# Altium PCB 后改2025底板线路板图.PcbDoc (part 2 of 4)
Units mm, origin at the board's own origin, x right, y up, seen from the top; angles counter-clockwise.
Board outline 200 x 230 mm, 4 copper layers (Top Layer, GND, POWER, Bottom Layer), stack 0.603 mm thick; 355 components, 331 nets, 1313 pads, 565 vias.
Unrouted connection lines stored in the file: 251.
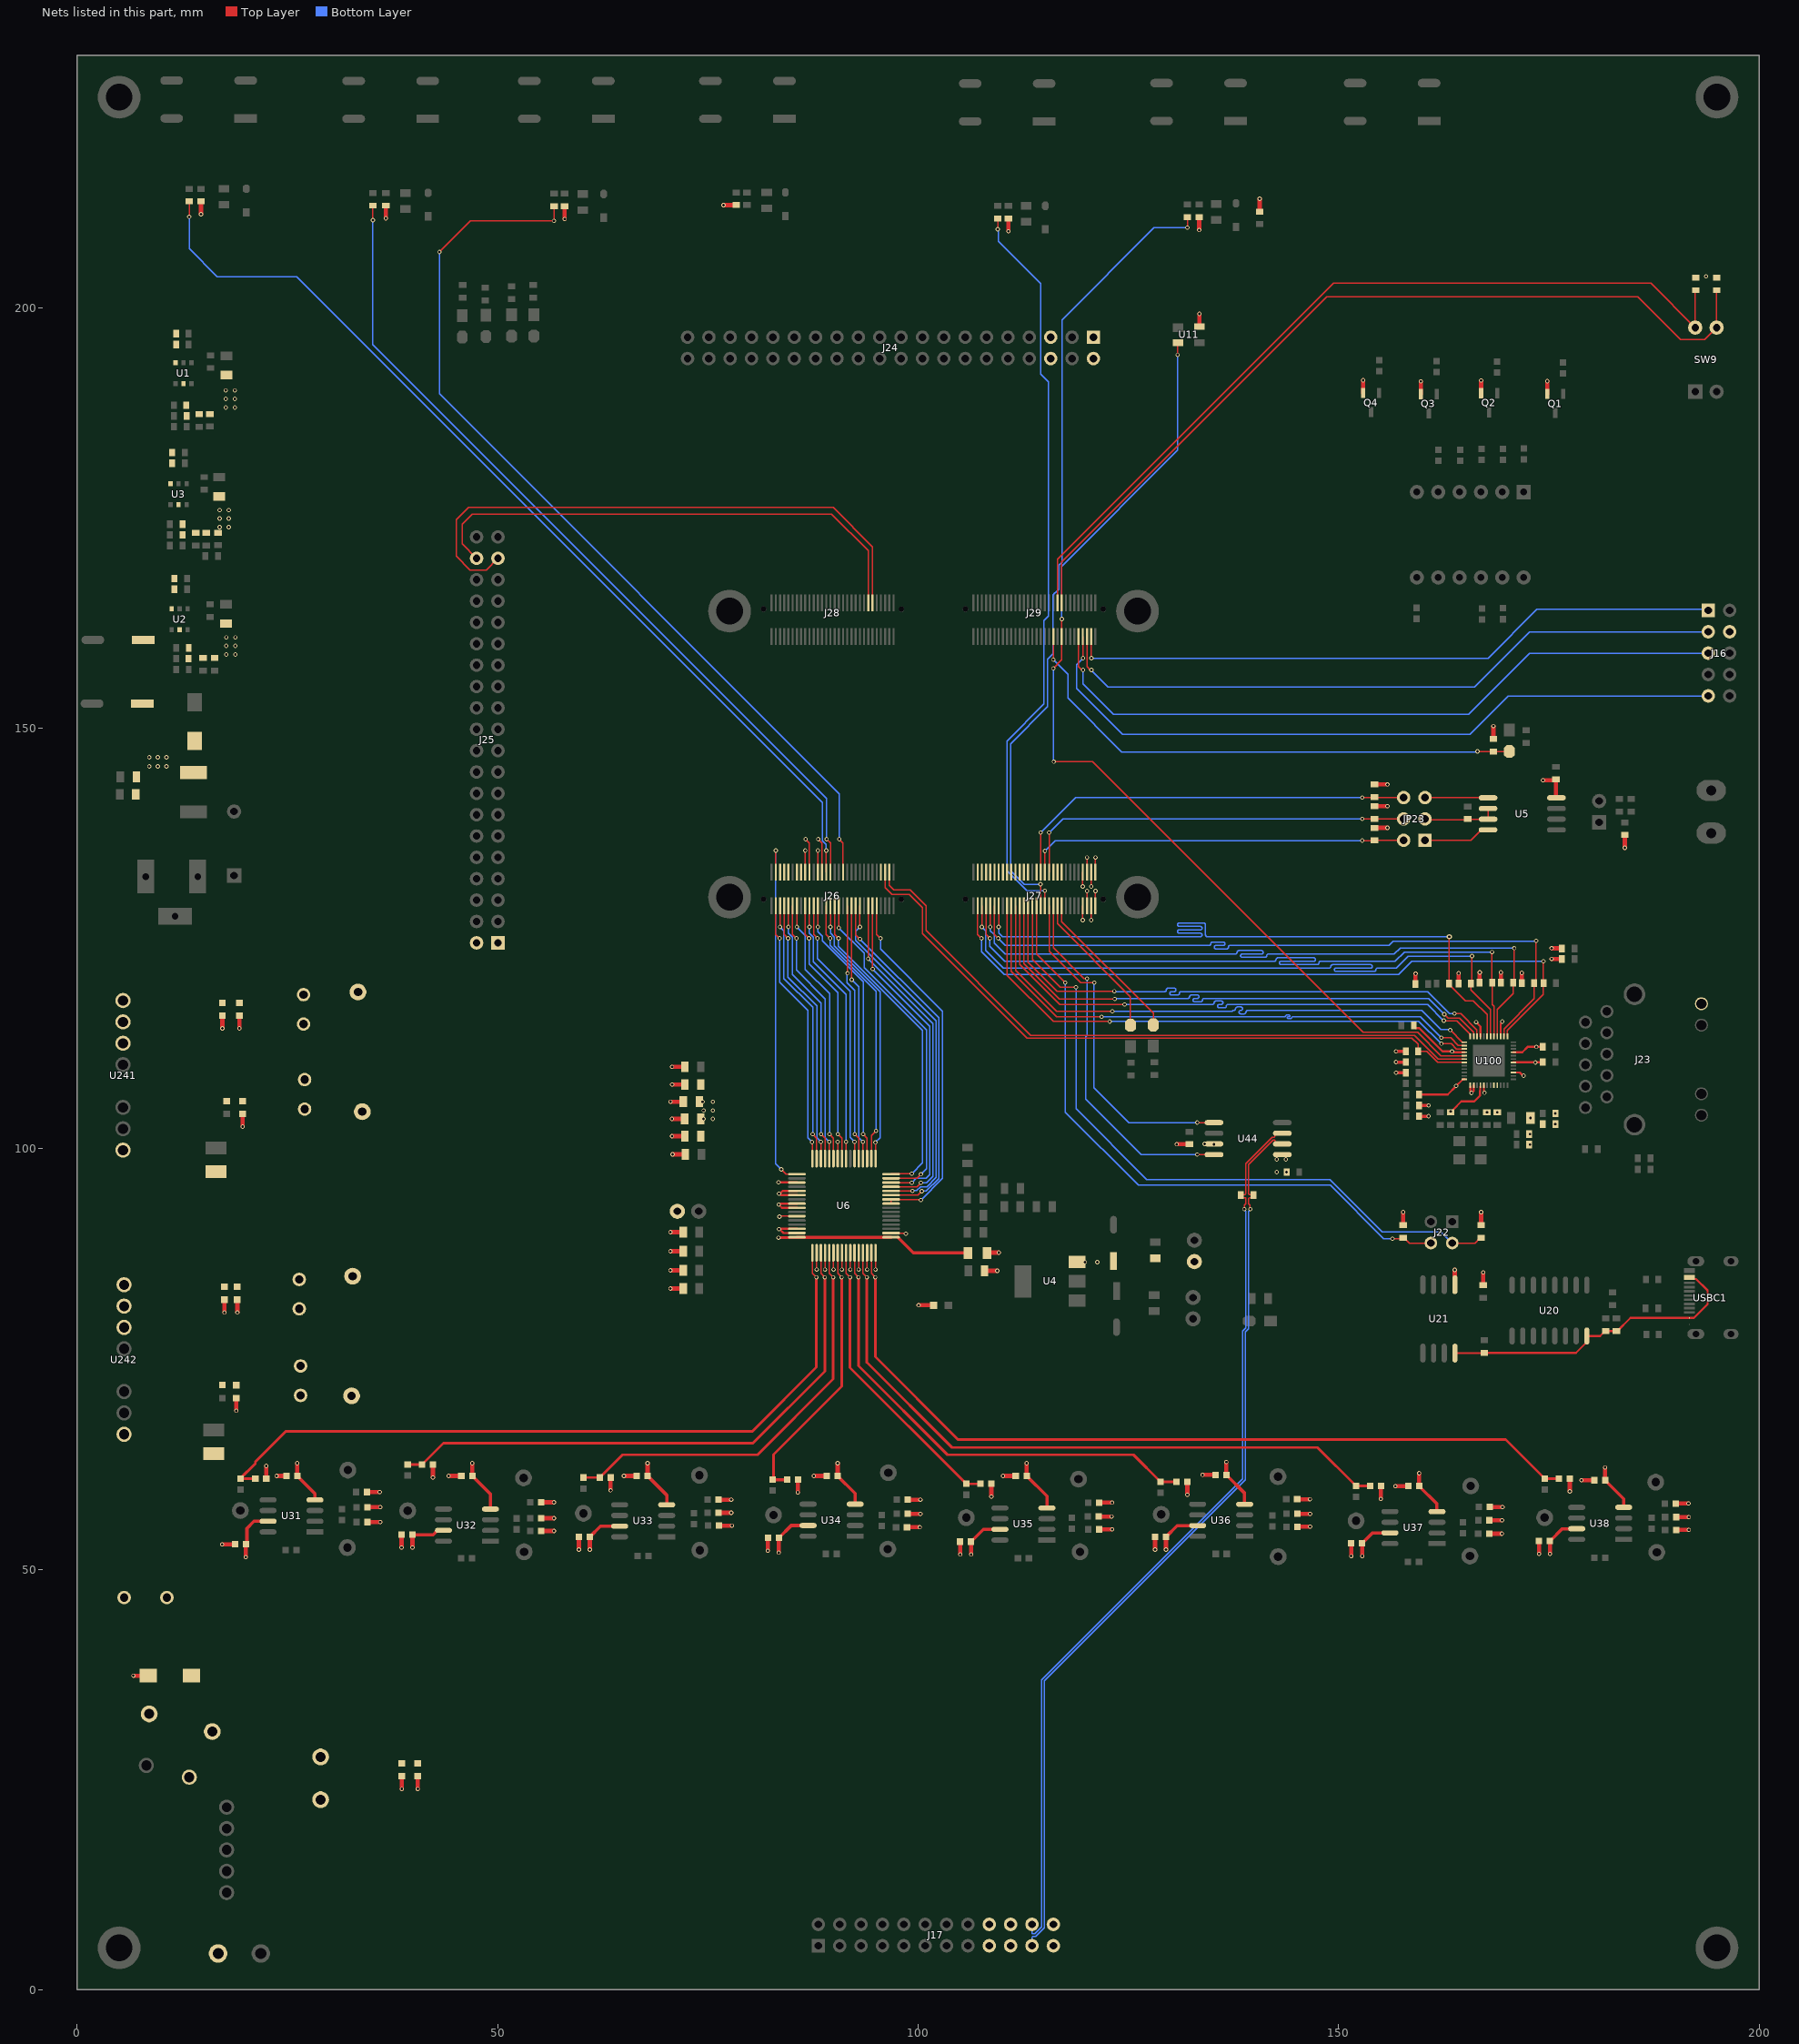
[diagram p4: the nets of this part, all layers, seen from the top]

## Via types
v1: diameter 0.508, hole 0.305, Top Layer to Bottom Layer, tented both sides, 558 vias
v2: diameter 0.635, hole 0.305, Top Layer to Bottom Layer, tented both sides, 7 vias

## Nets (pads, with @x,y where several pads share a name; then routed paths per layer and width w, separated by ;. In a path a pad name is that pad's centre, name@x,y a point inside that pad or via, vN(x,y) a via of type N, cw(c..) or ccw(c..) an arc to the next point about the centre after c; other vN are vias at no path point)
1V8: C12.2 C14.2 C16.1 C36.2 C37.2 L2.2 R7.1 R45.2 R46.2 R47.2 R51.2 R59.2 U100.15 U100.21 | length 12.3
  Top Layer w0.254: v1(166.348,115.038) 166.865,114.52 U100.21@166.865,113.359 ; U100.15@169.265,113.359 169.265,114.84 169.469,115.044 v1(169.469,115.113)
  Top Layer w0.381: v1@156.826,111.563 R59.2@157.971,111.563
  Top Layer w0.508: R51.2@164.248,119.634 164.262,119.647 164.262,120.84 v1(164.275,120.853) ; R47.2@166.75,119.736 166.763,119.749 166.763,120.941 v1(166.776,120.955) ; R46.2@169.278,119.736 169.291,119.749 169.291,120.941 v1(169.304,120.955) ; R45.2@171.767,119.685 171.78,119.698 171.78,120.891 v1(171.794,120.904) ; v1(175.335,122.556) 175.348,122.543 176.541,122.543 C36.2@176.554,122.53 ; v1(175.335,123.826) 175.348,123.813 176.541,123.813 C37.2@176.554,123.8
  other v1: 156.82,111.557 17.729,158.75 18.821,158.75 17.729,159.766 18.821,159.766 17.729,160.782 18.821,160.782
3V3: C20.2 C21.2 C22.1 C25.2 C52.2 C53.2 C54.2 C65.1 C79.2 C114.2 C151.2 C152.2 J16.4 J23.14 J24.5 J24.6 L3.2 Q1.2 Q2.2 Q3.2 Q4.2 R10.2 R12.1 R32.2 R33.2 R34.2 R60.2 R63.2 R65.2 R74.2 R92.2 R94.2 R97.2 R102.2 R108.2 R110.2 R112.2 R182.1 R183.1 R188.2 U5.8 U11.4 U21.1 U44.5 U100.6 U100.37 U100.38 U100.41 U100.44 U100.45 | length 46.5
  Top Layer w0.254: U100.37@165.665,107.338 165.665,106.829 165.796,106.698 v1(165.796,106.629) 165.796,106.632 166.065,106.9 U100.38@166.065,107.544 ; U100.41@167.265,107.544 167.265,106.784 167.349,106.7 v1(167.349,106.632) ; U100.6@170.772,110.251 174.233,110.251 C52.2@174.287,110.305
  Top Layer w0.381: v1@156.826,110.293 R63.2@157.971,110.293 ; v1@156.838,109.023 R65.2@157.983,109.023 ; C54.2@159.551,105.128 v1@160.696,105.128 ; C53.2@159.663,103.858 v1(160.696,103.858)
  Top Layer w0.508: v1(14.732,211.078) R97.2@14.732,212.602 ; v1(36.71,210.589) R102.2@36.71,212.113 ; v1(57.976,210.514) R110.2@57.976,212.038 ; v1(76.854,212.176) R108.2@78.378,212.176 ; v1(110.744,209.054) R92.2@110.744,210.578 ; v1(133.414,209.209) R94.2@133.414,210.733 ; U11.4@133.452,197.714 v1(133.452,199.238) ; C79.2@140.614,211.406 v1(140.614,212.93) ; Q4.2@152.915,189.829 v1(152.915,191.353) ; R32.2@154.28,138.14 v1(155.804,138.14) ; R33.2@154.28,140.704 v1(155.804,140.704) ; R34.2@154.28,143.295 v1(155.804,143.295) ; R188.2@157.67,90.92 v1(157.67,92.444) ; R60.2@159.13,119.583 159.143,119.597 159.143,120.789 v1(159.156,120.802) ; Q3.2@159.773,189.697 v1(159.773,191.221) ; v1(163.805,85.589) 163.817,85.576 163.817,83.833 U21.1@163.83,83.82 ; R74.2@166.941,90.92 v1(166.941,92.444) ; Q2.2@166.944,189.804 v1(166.944,191.328) ; C65.1@167.195,83.757 v1(167.195,85.281) ; R112.2@168.408,148.718 v1(168.408,150.242) ; v1(174.308,143.79) C25.2@175.832,143.79 ; Q1.2@174.81,189.728 v1(174.81,191.252) ; C25.2@175.832,143.89 C25.2@175.832,143.79 ; U5.8@175.958,141.643 U5.8@175.895,141.707 175.832,141.77 C25.2@175.832,143.79
  other v1: 142.646,97.206 143.815,97.206 142.646,98.73 143.715,98.73 167.636,104.328 168.865,104.328 160.702,105.134 156.832,109.017 173.392,110.251 156.82,110.287 16.942,173.888 18.034,173.888 16.942,174.904 18.034,174.904 16.942,175.92 18.034,175.92 193.675,203.708
5V_USB: C64.2 C147.1 C148.1 U20.16 U21.8 USBC1.A4B9 USBC1.B4A9 | length 37.3
  Top Layer w0.254: U21.8@163.83,75.692 C64.2@167.322,75.692 ; C64.2@167.322,75.716 178.218,75.716 179.514,77.013 U20.16@179.514,77.724 181.076,77.724 181.669,78.317 C147.1@181.769,78.317 ; C147.1@181.779,78.317 C148.1@183.039,78.317 ; C148.1@183.07,78.295 183.118,78.295 184.705,79.883 USBC1.A4B9@191.707,79.884 ; USBC1.A4B9@191.707,79.884 192.254,79.884 193.865,81.496 193.865,83.147 192.501,84.511 191.88,84.511 USBC1.B4A9@191.707,84.684
24V: C241.1 C242.1 C243.1 C244.1 D241.1 F241.2 L242.1 L243.1 R241.1
485_DE: J27.24 JP23.4 R33.1 | length 47.4
  Top Layer w0.152: J27.24@115.578,132.889 v1(115.578,137.566) ; v1(152.806,139.192) 154.268,139.192 R33.1@154.28,139.204 ; R33.1@154.369,139.192 JP23.4@157.734,139.192
  Bottom Layer w0.152: v1(115.578,137.566) 117.203,139.192 v1(152.806,139.192)
485_RXD: J27.28 JP23.6 R34.1 | length 49.6
  Top Layer w0.152: J27.28@114.578,132.889 v1(114.578,137.566) ; v1(152.806,141.732) 154.217,141.732 R34.1@154.28,141.795 154.342,141.732 JP23.6@157.734,141.732
  Bottom Layer w0.152: v1(114.578,137.566) 118.743,141.732 v1(152.806,141.732)
485_TXD: J27.26 JP23.2 R32.1 | length 45.7
  Top Layer w0.152: J27.26@115.078,132.889 v1(115.078,135.382) ; v1(152.806,136.628) 154.217,136.628 154.28,136.565 R32.1@154.342,136.628 ; R32.1@154.342,136.652 JP23.2@157.734,136.652
  Bottom Layer w0.152: v1(115.078,135.382) 116.323,136.627 152.781,136.627 v1@152.806,136.652
485DE: JP23.3 R17.2 U5.2 U5.3 | length 8.4
  Top Layer w0.152: JP23.3@160.274,139.192 160.363,139.103 165.279,139.103 R17.2@165.354,139.179 165.366,139.167 U5.3@167.386,139.167 ; U5.3@167.767,139.23 U5.2@167.767,140.437
485RXD: JP23.5 U5.1 | length 7.5
  Top Layer w0.152: JP23.5@160.274,141.732 160.287,141.719 167.754,141.719 U5.1@167.767,141.707
485TXD: JP23.1 U5.4 | length 8
  Top Layer w0.152: JP23.1@160.274,136.652 165.71,136.652 166.954,137.897 U5.4@167.767,137.897
+5: C11.2 C13.2 C15.1 C31.2 C41.2 C113.2 CE1.1 J3.1 J24.1 J24.2 J25.1 J25.2 L1.2 L6.2 R6.1 R14.2 U4.3 U44.3 | length 6.1
  Top Layer w0.508: C41.2@107.884,85.471 v1(109.408,85.471) ; L6.2@108.077,87.63 v1(109.601,87.63) ; v1(130.743,100.52) C113.2@132.267,100.52 ; v1(184.023,135.762) R14.2@184.023,137.286
  other v1: 119.837,86.512 121.31,86.512 135.179,100.52 134.061,100.559 17.678,188.112 18.771,188.112 17.678,189.128 18.771,189.128 17.678,190.144 18.771,190.144
+12V: +1.1 C1.1 C2.1 C3.2 C4.2 C7.2 C8.2 C9.2 C10.2 C18.2 C19.2 C261.2 C263.1 C264.1 D2.2 F1.2 J27.1@121.078,128.889 J27.2 J27.3 J27.4 J27.5 J27.6 J27.7 J27.8 U1.3 U1.5 U2.3 U2.5 U3.3 U3.5 U241.6 | length 13.8
  Top Layer w0.152: v1(119.57,127.161) 119.574,127.165 119.574,128.885 J27.7@119.578,128.889 ; v1(119.57,131.161) 119.574,131.165 119.574,132.885 J27.8@119.578,132.889 ; J27.5@120.078,128.889 120.082,128.893 120.082,130.613 v1(120.086,130.617) ; J27.6@120.078,132.889 120.082,132.893 120.082,134.613 v1(120.086,134.617) ; v1(120.57,127.161) 120.574,127.165 120.574,128.885 J27.3@120.578,128.889 ; v1(120.57,131.161) 120.574,131.165 120.574,132.885 J27.4@120.578,132.889 ; J27.1@121.078,128.889 121.082,128.893 121.082,130.613 v1(121.086,130.617) ; J27.2@121.078,132.889 121.082,132.893 121.082,134.613 v1(121.086,134.617)
  other v1: 8.585,145.44 9.601,145.44 10.617,145.44 8.585,146.533 9.601,146.533 10.617,146.533
+15V: +2.1 C204.1 C208.1 C212.1 C216.1 C220.1 C224.1 C228.1 C232.1 C267.2 C269.1 C270.1 J17.17 U31.7 U32.7 U33.7 U34.7 U35.7 U36.7 U37.7 U38.7 U242.6 | length 45
  Top Layer w0.381: C204.1@20.066,52.959 20.193,53.086 20.193,54.864 21.033,55.704 U31.7@22.699,55.704 ; C208.1@39.878,54.102 42.342,54.102 42.85,54.61 U32.7@43.561,54.61 ; C212.1@60.96,53.848 62.23,55.118 U33.7@64.516,55.118 ; C216.1@83.439,53.721 84.914,55.196 U34.7@86.922,55.196 ; C220.1@106.299,53.276 107.759,54.737 U35.7@109.728,54.737 ; C224.1@129.476,53.848 130.815,55.186 U36.7@133.238,55.186 ; C228.1@152.796,53.086 154.022,54.312 U37.7@156.107,54.312 ; C232.1@175.133,53.34 176.608,54.815 U38.7@178.308,54.815
  Top Layer w0.508: v1(20.066,51.435) C204.1@20.066,52.959 ; v1(39.878,52.578) C208.1@39.878,54.102 ; v1(60.96,52.324) C212.1@60.96,53.848 ; v1(83.439,51.968) C216.1@83.439,53.492 ; v1(106.299,51.752) C220.1@106.299,53.276 ; v1(129.476,52.324) C224.1@129.476,53.848 ; v1(152.796,51.562) C228.1@152.796,53.086 ; v1(175.133,51.816) C232.1@175.133,53.34
-12V: -4.1 C262.2 C265.2 C266.1 U241.8
-15V: -5.1 C203.2 C207.2 C211.2 C215.2 C219.2 C223.2 C227.2 C231.2 C268.2 C271.2 C272.1 J17.19 U31.4 U32.4 U33.4 U34.4 U35.4 U36.4 U37.4 U38.4 U242.8 | length 46.6
  Top Layer w0.381: C203.2@26.177,61.087 28.287,58.976 U31.4@28.287,58.244 ; C207.2@46.99,61.087 49.149,58.928 U32.4@49.149,57.15 ; C211.2@67.833,61.087 70.104,58.816 U33.4@70.104,57.658 ; C215.2@90.424,61.087 92.51,59.001 U34.4@92.51,57.736 ; C219.2@112.903,61.087 115.316,58.674 U35.4@115.316,57.277 ; C223.2@136.652,61.214 138.826,59.04 U36.4@138.826,57.726 ; C227.2@159.576,59.88 161.695,57.761 U37.4@161.695,56.852 ; C231.2@181.688,60.579 183.896,58.371 U38.4@183.896,57.355
  Top Layer w0.508: C203.2@26.177,61.087 v1(26.177,62.611) ; C207.2@46.99,61.087 v1(46.99,62.611) ; C211.2@67.833,61.087 v1(67.833,62.611) ; C215.2@90.424,61.087 v1(90.424,62.611) ; C219.2@112.903,61.087 v1(112.903,62.611) ; C223.2@136.652,61.214 v1(136.652,62.738) ; C227.2@159.576,59.88 v1(159.576,61.404) ; C231.2@181.688,60.579 v1(181.688,62.103)
A6: J29.17 R183.2 SW9.3 | length 102.9
  Top Layer w0.152: J29.17@117.078,164.889 117.078,169.758 148.59,201.27 185.576,201.27 190.652,196.193 193.526,196.193 SW9.3@194.945,197.612 R183.2@194.945,202.057 R183.2@194.945,202.069
A10: J27.52
A11: J27.50
A12: J27.46
A14: J27.42
A15: J27.55 R51.1 U100.18 | length 85.3
  Top Layer w0.152: v1(107.578,126.345) J27.55@107.578,128.889 ; R51.1@165.736,119.646 165.862,119.772 v1(165.862,122.885) ; R51.1@165.748,119.634 165.748,118.884 168.065,116.568 U100.18@168.065,113.359
  Bottom Layer w0.152: v1(107.578,126.345) 108.049,125.875 108.049,123.548 110.134,121.463 148.793,121.463 148.869,121.463 ccw(c148.869,121.666) 149.073,121.666 cw(c149.276,121.666) 149.276,121.869 153.816,121.869 cw(c153.816,121.666) 154.019,121.666 cw(c153.816,121.666) 153.816,121.463 149.682,121.463 ccw(c149.682,121.26) 149.479,121.26 ccw(c149.682,121.26) 149.682,121.056 154.222,121.056 ccw(c154.222,121.26) 154.426,121.26 cw(c154.629,121.26) 154.629,121.463 154.705,121.463 156.87,121.463 158.293,122.885 v1(165.862,122.885)
A16: J27.51 R46.1 U100.16 | length 85
  Top Layer w0.152: v1(108.578,126.345) J27.51@108.578,128.889 ; U100.16@168.865,113.359 168.865,116.541 170.778,118.454 R46.1@170.778,119.736 ; R46.1@170.766,119.748 170.878,119.86 v1(170.878,123.826)
  Bottom Layer w0.152: v1(108.578,126.345) 108.578,125.915 109.049,125.444 109.049,124.428 110.338,123.139 137.65,123.139 137.726,123.139 ccw(c137.726,123.342) 137.929,123.342 cw(c138.133,123.342) 138.133,123.546 140.843,123.546 cw(c140.843,123.342) 141.046,123.342 cw(c140.843,123.342) 140.843,123.139 138.539,123.139 ccw(c138.539,122.936) 138.336,122.936 ccw(c138.539,122.936) 138.539,122.733 141.249,122.733 ccw(c141.249,122.936) 141.453,122.936 cw(c141.656,122.936) 141.656,123.139 141.732,123.139 156.616,123.139 157.328,123.85 170.854,123.85 v1(170.878,123.826)
A17: J27.41 U100.26 | length 66.4
  Top Layer w0.152: J27.41@111.078,128.889 111.078,121.078 116.484,115.672 v1(121.818,115.672) ; v1(162.204,113.182) 163.322,113.182 164.229,112.275 164.934,112.275 U100.26@164.957,112.251
  Bottom Layer w0.152: v1(121.818,115.672) 139.268,115.672 141.834,115.672 143.321,115.672 143.521,115.672 143.597,115.672 ccw(c143.597,115.773) 143.699,115.773 cw(c143.8,115.773) 143.8,115.875 144.119,115.875 cw(c144.119,115.773) 144.22,115.773 cw(c144.119,115.773) 144.119,115.672 144.003,115.672 ccw(c144.003,115.57) 143.902,115.57 ccw(c144.003,115.57) 144.003,115.468 144.322,115.468 ccw(c144.322,115.57) 144.424,115.57 cw(c144.525,115.57) 144.525,115.672 144.601,115.672 159.715,115.672 v1(162.204,113.182)
A19: J27.33 U100.22 | length 66.7
  Top Layer w0.152: J27.33@113.078,128.889 113.078,122.151 116.518,118.711 122.855,118.711 122.863,118.72 v1(123.342,118.72) ; v1(163.779,116.053) 164.516,116.053 166.441,114.127 166.441,113.382 U100.22@166.465,113.359
  Bottom Layer w0.152: v1(123.342,118.72) 123.393,118.669 129.311,118.669 ; 129.235,118.669 129.311,118.669 ; v1(163.779,116.053) 163.211,116.053 160.595,118.669 131.343,118.669 131.267,118.669 ccw(c131.267,118.466) 131.064,118.466 cw(c130.861,118.466) 130.861,118.262 130.124,118.262 cw(c130.124,118.466) 129.921,118.466 cw(c130.124,118.466) 130.124,118.669 130.454,118.669 ccw(c130.454,118.872) 130.658,118.872 ccw(c130.454,118.872) 130.454,119.075 129.718,119.075 ccw(c129.718,118.872) 129.515,118.872 cw(c129.311,118.872) 129.311,118.669
A20: J26.52
ADIN1: C341.2 R221.2 U6.49 | length 89.7
  Top Layer w0.152: U6.49@87.436,87.618 87.436,85.181 v1(87.908,84.709)
  Top Layer w0.305: C341.2@21.194,60.757 21.179,60.772 19.431,60.772 R221.2@19.416,60.787 21.188,62.559 21.188,62.768 24.816,66.396 80.298,66.396 87.908,74.005 v1(87.908,84.709)
ADIN2: C342.2 R222.2 U6.51 | length 68.5
  Top Layer w0.152: U6.51@88.436,87.618 88.436,85.181 v1(88.908,84.709)
  Top Layer w0.305: R222.2@39.307,62.433 C342.2@41.006,62.433 43.546,64.973 80.348,64.973 88.908,73.534 v1(88.908,84.709)
ADIN3: C343.2 R223.2 U6.53 | length 49.8
  Top Layer w0.152: U6.53@89.436,87.618 89.436,85.181 v1(89.908,84.709)
  Top Layer w0.305: R223.2@60.198,60.899 C343.2@62.139,60.899 64.842,63.602 80.918,63.602 89.908,72.592 v1(89.908,84.709)
ADIN4: C344.2 R224.2 U6.55 | length 32.3
  Top Layer w0.152: U6.55@90.436,87.618 90.436,85.181 v1(90.908,84.709)
  Top Layer w0.305: R224.2@82.702,60.655 82.804,60.757 82.804,63.627 90.908,71.731 v1(90.908,84.709)
  Top Layer w0.381: R224.2@82.702,60.655 C344.2@84.407,60.655
ADIN5: C345.2 R225.2 U6.57 | length 35.1
  Top Layer w0.152: U6.57@91.436,87.618 91.436,85.181 v1(91.908,84.709)
  Top Layer w0.305: v1(91.908,84.709) 91.908,73.967 R225.2@105.727,60.147 C345.2@107.412,60.147
ADIN6: C346.2 R226.2 U6.59 | length 57.1
  Top Layer w0.152: U6.59@92.436,87.618 92.436,85.181 v1(92.908,84.709)
  Top Layer w0.305: v1(92.908,84.709) 92.908,74.191 103.498,63.602 125.601,63.602 R226.2@128.829,60.373 C346.2@130.709,60.373
ADIN7: C347.2 R227.2 U6.61 | length 79.1
  Top Layer w0.152: U6.61@93.436,87.618 93.436,85.181 v1(93.908,84.709)
  Top Layer w0.305: v1(93.908,84.709) 93.908,74.591 104.034,64.465 147.498,64.465 152.076,59.887 152.089,59.887 C347.2@153.725,59.887
  Top Layer w0.381: C347.2@153.725,59.887 C347.2@153.731,59.893
ADIN8: C348.2 R228.2 U6.63 | length 99.8
  Top Layer w0.152: U6.63@94.436,87.618 94.436,85.181 v1(94.908,84.709)
  Top Layer w0.305: v1(94.908,84.709) 94.908,75.255 104.736,65.427 169.853,65.427 R228.2@174.498,60.782 174.5,60.781 C348.2@176.185,60.779 C348.2@176.185,60.779
ADVDD10_PS: C55.2 C153.2 C154.2 R44.1 U100.3 U100.9 U100.40 | length 10.6
  Top Layer w0.254: C55.2@163.321,104.328 v1(163.321,104.428) ; C55.2@163.421,104.428 163.521,104.428 163.644,104.551 163.644,104.651 164.602,105.609 166.13,105.609 166.815,106.295 166.815,106.852 166.844,106.881 U100.40@166.844,107.338 ; U100.3@170.772,109.051 171.547,109.051 171.926,108.672 v1(172.009,108.672) ; U100.9@170.772,111.451 171.831,111.451 172.471,112.091 C153.2@174.287,112.091
  other v1: 175.76,102.909 175.76,104.191 173.52,112.091
AGND: C23.1 C24.1 C26.1 C27.1 C28.2 C30.2 C32.1 C33.1 C34.1 C40.1 C201.2 C202.1 C203.1 C204.2 C205.2 C206.1 C207.1 C208.2 C209.2 C210.1 C211.1 C212.2 C213.2 C214.1 C215.1 C216.2 C217.2 C218.1 C219.1 C220.2 C221.2 C222.1 C223.1 C224.2 C225.2 C226.1 C227.1 C228.2 C229.2 C230.1 C231.1 C232.2 C241.2 C242.2 C243.2 C244.2 C262.1 C263.2 C264.2 C265.1 C266.2 C268.1 C269.2 C270.2 C271.1 C272.2 C341.1 C342.1 C343.1 C344.1 C345.1 C346.1 C347.1 C348.1 D241.2 J1.2 J17.18 J17.20 J17.23 J17.24 L4.1 P241.1 R211.2 R212.2 R213.2 R214.2 R215.2 R216.2 R217.2 R218.2 R241.2 U6.2 U6.26 U6.35 U6.40 U6.41 U6.43 U6.46 U6.47 U6.50 U6.52 U6.54 U6.56 U6.58 U6.60 U6.62 U6.64 U241.1 U241.7 U242.1 U242.7 | length 136.2
  Top Layer w0.152: v1(83.515,91.909) 83.575,91.968 U6.43@85.586,91.968 ; v1(87.936,85.626) U6.50@87.936,87.618 ; v1(88.936,85.626) U6.52@88.936,87.618 ; v1(89.936,85.626) U6.54@89.936,87.618 ; U6.26@90.436,98.818 v1(90.436,100.81) ; v1(90.936,85.626) U6.56@90.936,87.618 ; v1(91.936,85.626) U6.58@91.936,87.618 ; v1(92.936,85.626) U6.60@92.936,87.618 ; v1(93.936,85.626) U6.62@93.936,87.618 ; v1(94.936,85.626) U6.64@94.936,87.618 ; U6.2@96.786,89.968 96.814,89.94 98.477,89.94 v1(98.534,89.883)
  Top Layer w0.254: v1(83.414,95.985) 83.422,95.977 85.577,95.977 U6.35@85.586,95.968 ; U6.47@85.586,89.968 83.998,89.968 83.544,90.422 v1(83.464,90.422) 83.511,90.468 U6.46@85.586,90.468 ; U6.41@85.586,92.968 83.816,92.968 v1(83.439,93.345) 83.542,93.345 83.665,93.468 U6.40@85.586,93.468
  Top Layer w0.508: v1(6.691,37.338) D241.2@8.215,37.338 ; v1(17.242,52.959) C204.2@18.766,52.959 ; v1(17.272,114.3) C262.1@17.272,115.824 ; v1(17.526,80.518) C272.2@17.526,82.042 ; v1(18.923,68.834) C269.2@18.923,70.358 ; v1(19.05,80.518) C268.1@19.05,82.042 ; v1(19.304,114.302) C266.2@19.304,115.826 ; v1(19.685,102.62) C263.2@19.685,104.144 ; C341.1@22.494,60.757 v1(22.494,62.281) ; v1(23.724,61.087) C203.1@24.877,61.087 ; R211.2@34.449,59.172 v1(35.973,59.172) ; C201.2@34.525,55.602 v1(36.049,55.602) ; C202.1@34.525,57.38 v1(36.049,57.38) ; v1(38.578,52.578) C208.2@38.578,54.102 ; v1(38.608,23.878) C244.2@38.608,25.402 ; v1(40.513,23.878) C242.2@40.513,25.402 ; v1(42.306,60.909) C342.1@42.306,62.433 ; v1(44.166,61.087) C207.1@45.69,61.087 ; C205.2@55.181,54.546 v1(56.706,54.546) ; C206.1@55.181,56.07 v1(56.706,56.07) ; R212.2@55.181,57.963 v1(56.706,57.963) ; v1(59.66,52.324) C212.2@59.66,53.848 ; v1(63.439,59.375) C343.1@63.439,60.899 ; v1(65.009,61.087) C211.1@66.533,61.087 ; v1(70.551,83.375) C40.1@72.075,83.375 ; v1(70.551,85.534) C32.1@72.075,85.534 ; v1(70.551,87.795) C34.1@72.075,87.795 ; v1(70.551,90.081) C33.1@72.075,90.081 ; v1(70.558,105.578) C23.1@72.082,105.578 ; v1(70.721,103.547) C27.1@72.245,103.547 ; v1(70.739,101.473) C26.1@72.263,101.473 ; v1(70.739,109.728) C28.2@72.263,109.728 ; v1(70.745,107.61) C24.1@72.269,107.61 ; v1(70.805,99.314) C30.2@72.329,99.314 ; R213.2@76.251,58.268 v1(77.775,58.268) ; C210.1@76.263,56.706 v1(77.787,56.706) ; C209.2@76.342,55.181 v1(77.866,55.181) ; v1(82.139,52.197) C216.2@82.139,53.721 ; v1(85.707,59.131) C344.1@85.707,60.655 ; v1(87.6,61.087) C215.1@89.124,61.087 ; C213.2@98.679,54.991 v1(100.203,54.991) ; C214.1@98.742,56.578 v1(100.266,56.578) ; R214.2@98.742,58.268 v1(100.266,58.268) ; v1(100.051,81.382) L4.1@101.575,81.382 ; v1(104.999,51.752) C220.2@104.999,53.276 ; v1(108.712,58.623) C345.1@108.712,60.147 ; v1(110.079,61.087) C219.1@111.603,61.087 ; C218.1@121.491,56.261 v1(123.015,56.261) ; C217.2@121.539,54.737 v1(123.063,54.737) ; R215.2@121.539,57.912 v1(123.063,57.912) ; v1(128.176,52.324) C224.2@128.176,53.848 ; v1(132.009,58.849) C346.1@132.009,60.373 ; v1(133.828,61.214) C223.1@135.352,61.214 ; R216.2@145.074,58.318 v1(146.598,58.318) ; C221.2@145.097,55.054 v1(146.621,55.054) ; C222.1@145.097,56.578 v1(146.621,56.578) ; v1(151.496,51.562) C228.2@151.496,53.086 ; v1(155.031,58.369) C347.1@155.031,59.893 ; v1(156.751,59.88) C227.1@158.275,59.88 ; C225.2@167.894,54.229 v1(169.418,54.229) ; C226.1@167.909,55.817 v1(169.433,55.817) ; R217.2@167.97,57.389 v1(169.494,57.389) ; v1(173.833,51.816) C232.2@173.833,53.34 ; v1(177.485,59.255) C348.1@177.485,60.779 ; v1(178.864,60.579) C231.1@180.388,60.579 ; R218.2@190.083,57.81 v1(191.607,57.81) ; C229.2@190.119,54.673 v1(191.643,54.673) ; C230.1@190.119,56.197 v1(191.643,56.197)
AVCC: C23.2 C24.2 C26.2 C27.2 L6.1 U6.1 U6.37 U6.38 U6.48 | length 26.7
  Top Layer w0.254: v1(83.464,94.64) v1@83.567,94.64 ; U6.38@85.586,94.468 83.74,94.468 v1@83.567,94.64 ; U6.37@85.586,94.968 83.895,94.968 v1@83.567,94.64
  Top Layer w0.381: v1(83.414,89.408) U6.48@85.586,89.468 U6.1@96.786,89.468 ; U6.1@97.605,89.468 99.443,87.63 L6.1@105.791,87.63
  other v1: 74.498,103.53 75.59,103.53 74.498,104.546 75.59,104.546 74.378,105.562 75.59,105.562
B5: J27.23 U44.1 | length 40.8
  Top Layer w0.152: J27.23@115.578,128.889 115.578,123.487 119.329,119.736 v1(120.955,119.736) ; v1(133.192,103.099) U44.1@135.179,103.099
  Bottom Layer w0.152: v1(120.955,119.736) 120.904,119.685 120.904,107.239 125.044,103.099 v1(133.192,103.099)
B7: J29.19 R182.2 SW9.4 | length 101.3
  Top Layer w0.152: J29.19@116.578,164.889 116.578,170.07 149.403,202.895 187.122,202.895 SW9.4@192.405,197.612 192.405,201.993 R182.2@192.469,202.057
B17: J27.47 R57.2 U100.19 | length 85.3
  Top Layer w0.152: v1(109.578,126.345) J27.47@109.578,128.889 ; v2(163.146,125.195) R57.2@163.146,119.634 163.146,119.534 165.087,117.593 165.998,117.593 167.665,115.925 U100.19@167.665,113.359
  Bottom Layer w0.152: v1(109.578,126.345) 109.578,125.631 110.014,125.195 130.768,125.195 133.566,125.195 ccw(c133.566,125.398) 133.566,125.602 131.047,125.602 cw(c131.047,125.805) 130.844,125.805 cw(c131.047,125.805) 131.047,126.008 133.566,126.008 ccw(c133.566,126.211) 133.769,126.211 ccw(c133.566,126.211) 133.566,126.414 131.047,126.414 cw(c131.047,126.618) 130.844,126.618 cw(c131.047,126.618) 131.047,126.821 133.972,126.821 cw(c133.972,126.618) 134.175,126.618 134.175,125.398 ccw(c134.379,125.398) 134.379,125.195 134.455,125.195 150.012,125.195 154.635,125.195 v2(163.146,125.195)
B18: J27.37 U100.24 | length 66.4
  Top Layer w0.152: J27.37@112.078,128.889 112.078,121.907 116.84,117.145 v1(124.562,117.145) ; v1(162.509,115.214) 164.042,115.214 165.641,113.615 165.641,113.382 U100.24@165.665,113.359
  Bottom Layer w0.152: v1(124.562,117.145) 134.925,117.145 135.001,117.145 ccw(c135.001,117.348) 135.204,117.348 cw(c135.407,117.348) 135.407,117.551 136.042,117.551 cw(c136.042,117.348) 136.246,117.348 cw(c136.042,117.348) 136.042,117.145 135.814,117.145 ccw(c135.814,116.942) 135.611,116.942 ccw(c135.814,116.942) 135.814,116.738 136.449,116.738 ccw(c136.449,116.942) 136.652,116.942 cw(c136.855,116.942) 136.855,117.145 136.931,117.145 160.579,117.145 v1(162.509,115.214)
B19: J26.54
B20: J26.56
BUSY: J26.11 U6.14 | length 39.8
  Top Layer w0.152: J26.11@94.578,128.889 94.584,128.883 94.584,121.367 v1(94.59,121.361) ; U6.14@96.786,95.968 96.796,95.958 99.241,95.958 v1(99.251,95.948)
  Bottom Layer w0.152: v1(94.59,121.361) 101.397,114.554 101.397,96.926 100.94,96.469 99.771,96.469 v1(99.251,95.948)
C5: J22.4 J27.29 R188.1 | length 76
  Top Layer w0.152: J27.29@114.078,128.889 114.078,123.161 v1(117.504,119.736) ; v1(156.4,89.281) 157.531,89.281 R188.1@157.67,89.42 ; R188.1@157.671,89.408 157.782,89.408 158.417,88.773 J22.4@160.972,88.773
  Bottom Layer w0.152: v1(117.504,119.736) 117.504,104.34 126.187,95.656 148.996,95.656 155.372,89.281 v1(156.4,89.281)
C6: J27.27 R95.2 | length 95.5
  Top Layer w0.152: v1(114.554,131.432) 114.566,131.42 114.566,128.901 J27.27@114.578,128.889 ; v1(132.017,209.486) R95.2@132.017,210.733
  Bottom Layer w0.152: v1(114.554,131.432) 112.611,131.432 110.998,133.045 110.998,148.145 115.379,152.527 115.379,158.178 116.014,158.814 116.014,165.825 116.267,166.078 116.304,166.078 116.751,166.525 116.751,169.354 117.094,169.697 117.094,198.515 128.065,209.486 v1(132.017,209.486)
c7: J29.18 U11.2 U100.29 | length 119.3
  Top Layer w0.152: v1(116.078,157.099) 117.078,158.099 117.078,159.1 117.069,159.109 117.069,159.509 117.078,159.518 J29.18@117.078,160.889 117.078,162.951 v1(117.085,162.957) ; v1(116.129,145.999) 120.752,145.999 152.908,113.843 159.384,113.843 162.176,111.051 U100.29@164.957,111.051 ; v1(130.861,194.361) 130.861,195.758 U11.2@130.912,195.809
  Bottom Layer w0.152: v1(116.078,157.099) 116.078,146.05 v1(116.129,145.999) ; v1(117.085,162.957) 117.056,162.986 117.056,169.227 130.861,183.032 v1(130.861,194.361)
C8: J22.2 J27.31 R74.1 | length 82.4
  Top Layer w0.152: J27.31@113.578,128.889 113.578,126.35 113.595,126.333 113.595,122.494 116.892,119.197 v1(118.77,119.197) ; J22.2@163.512,88.773 166.194,88.773 166.829,89.408 R74.1@166.941,89.408
  Bottom Layer w0.152: v1(118.77,119.197) 118.77,104.75 127.178,96.342 148.958,96.342 155.194,90.106 162.179,90.106 J22.2@163.512,88.773
C10: J26.4 U100.30 | length 80.2
  Top Layer w0.152: J26.4@96.578,132.889 96.578,131.311 97.111,130.778 99.041,130.778 100.94,128.88 100.94,125.933 113.411,113.462 159.003,113.462 161.814,110.651 U100.30@164.957,110.651
C11: J26.6 R59.1 U100.31 | length 81.6
  Top Layer w0.152: J26.6@96.078,132.889 96.078,131.046 96.881,130.243 98.966,130.243 100.533,128.676 100.533,125.578 112.954,113.157 158.725,113.157 159.471,112.411 R59.1@159.471,111.563 159.477,111.557 160.477,111.557 161.783,110.251 U100.31@164.957,110.251
C13: J27.36
C15: J27.38
C16: J27.34
C17: J27.20
C18: J27.56
C20: J26.58 U6.33 | length 42.8
  Top Layer w0.152: J26.58@83.078,132.889 v1(83.078,135.433) ; v1(83.718,97.536) 84.286,96.968 U6.33@85.586,96.968
  Bottom Layer w0.152: v1(83.078,135.433) 83.078,125.829 83.049,125.799 83.049,116.35 83.054,116.344 83.054,98.2 v1(83.718,97.536)
CAN_N: J17.21 R116.2 U44.6 | length 110.4
  Top Layer w0.152: v1(139.497,92.812) 139.443,92.865 139.443,93.294 139.282,93.456 139.282,94.076 139.371,94.165 139.605,94.165 139.879,94.439 139.879,94.539 139.371,94.539 139.282,94.628 139.282,98.101 142.222,101.041 142.349,101.041 142.438,100.952 142.438,100.77 142.649,100.559 U44.6@143.307,100.559
  Bottom Layer w0.152: J17.21@113.538,5.232 113.538,6.261 113.627,6.35 114.001,6.35 114.999,7.347 114.999,36.733 138.9,60.634 138.9,78.178 139.294,78.572 139.294,92.545 139.497,92.748 v1(139.497,92.812)
CAN_P: J17.22 R116.1 U44.7 | length 110.4
  Top Layer w0.152: v1(138.786,92.812) 138.815,92.841 138.815,93.294 138.977,93.456 138.977,94.076 138.888,94.165 138.653,94.165 138.379,94.439 138.379,94.539 138.888,94.539 138.977,94.628 138.977,98.227 142.096,101.346 142.349,101.346 142.438,101.435 142.438,101.617 142.649,101.829 U44.7@143.307,101.829
  Bottom Layer w0.152: J17.22@113.538,7.772 113.538,6.744 113.627,6.655 113.875,6.655 114.694,7.474 114.694,36.859 138.595,60.76 138.595,78.304 138.989,78.698 138.989,92.545 138.786,92.748 v1(138.786,92.812)
CAN_RX: J27.21 U44.4 | length 42.9
  Top Layer w0.152: J27.21@116.078,128.889 116.078,123.901 119.737,120.242 120.067,120.242 v1(120.091,120.218) ; v1(133.192,99.289) U44.4@135.179,99.289
  Bottom Layer w0.152: v1(120.091,120.218) 120.091,113.471 119.939,113.318 119.939,105.867 126.517,99.289 v1(133.192,99.289)
CONVSTAB: J26.9 U6.9 U6.10 | length 43.4
  Top Layer w0.152: J26.9@95.078,128.889 95.078,125.448 v1(95.531,124.995) ; U6.9@96.786,93.468 U6.10@96.786,93.968 96.814,93.94 100.269,93.94 v1(100.33,93.878)
  Bottom Layer w0.152: v1(95.531,124.995) 95.531,123.721 102.921,116.332 102.921,96.469 v1(100.33,93.878)
CS: J26.13 U6.13 | length 40.8
  Top Layer w0.152: v1@94.078,122.577 94.078,127.165 94.082,127.168 94.082,127.568 94.078,127.572 J26.13@94.078,128.889 ; U6.13@96.786,95.468 99.049,95.468 99.051,95.466 99.45,95.466 99.452,95.468 99.849,95.468 v1(100.33,95.948)
  Bottom Layer w0.152: v1(94.071,122.569) 101.752,114.888 101.752,96.723 100.978,95.948 v1(100.33,95.948)
CTP_INT: J25.38 J28.13 | length 61.6
  Top Layer w0.152: J25.38@47.498,170.18 45.783,171.894 45.783,174.244 46.99,175.451 89.725,175.451 94.078,171.098 J28.13@94.078,164.889
CTP_RST: J25.37 J28.11 | length 69.2
  Top Layer w0.152: J25.37@50.038,170.18 48.651,168.793 46.726,168.793 45.085,170.434 45.085,174.752 46.545,176.213 89.916,176.213 94.578,171.551 J28.11@94.578,164.889
D8: "LED3 RED.2" J27.19 | length 17.8
  Top Layer w0.152: J27.19@116.578,128.889 116.578,126.746 125.247,118.076 125.247,114.656
D9: J27.30
D10: J27.39 U100.25 | length 66.5
  Top Layer w0.152: J27.39@111.578,128.889 111.578,121.201 116.447,116.332 v1(123.088,116.332) ; v1(163.271,114.097) 163.279,114.097 164.701,112.675 164.934,112.675 U100.25@164.957,112.651
  Bottom Layer w0.152: v1(123.088,116.332) 137.363,116.332 137.465,116.434 137.541,116.434 ccw(c137.541,116.637) 137.744,116.637 cw(c137.947,116.637) 137.947,116.84 138.379,116.84 cw(c138.379,116.637) 138.582,116.637 cw(c138.379,116.637) 138.379,116.434 138.354,116.434 ccw(c138.354,116.23) 138.151,116.23 ccw(c138.354,116.23) 138.354,116.027 138.786,116.027 ccw(c138.786,116.23) 138.989,116.23 cw(c139.192,116.23) 139.192,116.434 139.268,116.434 159.868,116.434 162.154,114.148 163.22,114.148 v1(163.271,114.097)
D11: J27.49 R45.1 U100.14 | length 85
  Top Layer w0.152: J27.49@109.078,128.889 109.078,125.448 v1(109.531,124.995) ; U100.14@169.665,113.359 169.665,114.242 173.267,117.844 R45.1@173.267,119.685 ; R45.1@173.255,119.697 173.482,119.924 v1(173.482,124.714)
  Bottom Layer w0.152: v1(109.531,124.995) 110.371,124.155 134.531,124.155 134.607,124.155 ccw(c134.607,124.358) 134.81,124.358 cw(c135.014,124.358) 135.014,124.562 136.284,124.562 cw(c136.284,124.358) 136.487,124.358 cw(c136.284,124.358) 136.284,124.155 135.42,124.155 ccw(c135.42,123.952) 135.217,123.952 ccw(c135.42,123.952) 135.42,123.749 136.69,123.749 ccw(c136.69,123.952) 136.893,123.952 cw(c137.096,123.952) 137.096,124.155 137.173,124.155 156.007,124.155 156.501,124.649 173.417,124.649 v1(173.482,124.714)
D13: J27.57 R52.2 U100.13 | length 85
  Top Layer w0.152: J27.57@107.078,128.889 107.078,125.448 v1(107.531,124.995) ; U100.13@170.065,113.359 170.065,114.032 174.346,118.313 R52.2@174.346,119.697 ; v1(174.346,122.276) R52.2@174.346,119.697 ; R52.2@174.358,119.685 R52.2@174.346,119.697
  Bottom Layer w0.152: v1(107.531,124.995) 107.531,124.117 107.544,124.104 107.544,123.393 110.236,120.701 157.15,120.701 158.725,122.276 171.794,122.276 v1(174.346,122.276)
D14: J27.18
D15: J27.44
D18: J26.46
D19: J26.44 | length 2.5
  Top Layer w0.152: J26.44@86.578,132.889 v1(86.578,135.433)
D20: J26.42 | length 4.1
  Top Layer w0.152: v1(86.624,136.783) 87.078,136.33 J26.42@87.078,132.889
DB0: J26.29 U6.16 | length 39.2
  Top Layer w0.152: J26.29@90.078,128.889 90.078,125.448 v1(90.531,124.995) ; U6.16@96.786,96.968 96.814,96.996 99.219,96.996 v1(99.251,97.028)
  Bottom Layer w0.152: v1(90.531,124.995) 90.531,124.048 100.533,114.046 100.533,98.311 v1(99.251,97.028)
DB1: J26.31 U6.17 | length 32.8
  Top Layer w0.152: v1(89.578,126.345) J26.31@89.578,128.889 ; v1(94.919,100.736) 94.927,100.728 94.927,98.827 U6.17@94.936,98.818
  Bottom Layer w0.152: v1(89.578,126.345) 89.578,125.631 90.049,125.16 90.049,124.099 92.806,121.342 95.479,118.67 95.479,101.296 v1(94.919,100.736)
DB2: J26.33 U6.18 | length 32.8
  Top Layer w0.152: J26.33@89.078,128.889 89.078,125.448 v1(89.531,124.995) ; U6.18@94.436,98.818 94.436,101.548 v1(94.996,102.108)
  Bottom Layer w0.152: v1(89.531,124.995) 89.531,124.186 94.996,118.721 v1(94.996,102.108)
DB3: J26.37 U6.19 | length 32.5
  Top Layer w0.152: v1(88.078,126.345) J26.37@88.078,128.889 ; v1(93.464,101.727) 93.936,101.255 U6.19@93.936,98.818
  Bottom Layer w0.152: v1(88.078,126.345) 88.078,125.766 88.595,125.249 88.595,124.691 93.464,119.822 v1(93.464,101.727)
DB4: J26.21 U6.20 | length 30.6
  Top Layer w0.152: J26.21@92.078,128.889 92.089,128.878 92.089,120.102 v1(92.1,120.091) ; U6.20@93.436,98.818 v1(93.436,100.81)
  Bottom Layer w0.152: v1(92.1,120.091) 92.947,119.245 92.947,101.299 v1(93.436,100.81)
DB5: J26.23 U6.21 | length 30.7
  Top Layer w0.152: J26.23@91.578,128.889 91.607,128.86 v1(91.607,120.853) ; v1(92.464,101.727) 92.936,101.255 U6.21@92.936,98.818
  Bottom Layer w0.152: v1(91.607,120.853) 91.542,120.788 91.542,119.736 92.464,118.813 v1(92.464,101.727)
DB6: J26.39 U6.22 | length 32.1
  Top Layer w0.152: J26.39@87.578,128.889 87.578,125.448 v1(88.032,124.995) ; U6.22@92.436,98.818 v1(92.436,100.81)
  Bottom Layer w0.152: v1(88.032,124.995) 88.032,122.585 91.897,118.72 91.897,101.349 v1(92.436,100.81)
DB7: J26.41 U6.24 | length 31.9
  Top Layer w0.152: v1(87.078,126.345) J26.41@87.078,128.889 ; U6.24@91.436,98.818 v1(91.436,100.81)
  Bottom Layer w0.152: v1(87.078,126.345) 87.078,125.631 87.549,125.16 87.549,122.204 91.436,118.317 v1(91.436,100.81)
DB8: J26.43 U6.25 | length 31.9
  Top Layer w0.152: J26.43@86.578,128.889 86.578,125.448 v1(87.032,124.995) ; v1(90.464,101.727) 90.936,101.255 U6.25@90.936,98.818
  Bottom Layer w0.152: v1(87.032,124.995) 87.032,121.96 90.464,118.527 v1(90.464,101.727)
DB9: J26.47 U6.27 | length 31.9
  Top Layer w0.152: v1(85.578,126.345) J26.47@85.578,128.889 ; v1(89.464,101.727) 89.936,101.255 U6.27@89.936,98.818
  Bottom Layer w0.152: v1(85.578,126.345) 86.549,125.374 86.549,121.325 89.464,118.41 v1(89.464,101.727)
DB10: J26.49 U6.28 | length 31.9
  Top Layer w0.152: J26.49@85.078,128.889 85.078,125.448 v1(85.531,124.995) ; U6.28@89.436,98.818 v1(89.436,100.81)
  Bottom Layer w0.152: v1(85.531,124.995) 85.531,121.225 88.947,117.809 88.947,101.299 v1(89.436,100.81)
DB11: J26.51 U6.29 | length 31.9
  Top Layer w0.152: v1(84.578,126.345) J26.51@84.578,128.889 ; v1(88.464,101.727) 88.936,101.255 U6.29@88.936,98.818
  Bottom Layer w0.152: v1(84.578,126.345) 84.578,125.631 85.049,125.16 85.049,120.691 88.464,117.276 v1(88.464,101.727)
DB12: J26.53 U6.30 | length 31.9
  Top Layer w0.152: J26.53@84.078,128.889 84.078,125.448 v1(84.531,124.995) ; U6.30@88.436,98.818 v1(88.436,100.81)
  Bottom Layer w0.152: v1(84.531,124.995) 84.531,120.396 87.947,116.981 87.947,101.299 v1(88.436,100.81)
DB13: J26.55 U6.31 | length 31.9
  Top Layer w0.152: v1(83.578,126.345) J26.55@83.578,128.889 ; v1(87.464,101.727) 87.936,101.255 U6.31@87.936,98.818
  Bottom Layer w0.152: v1(83.578,126.345) 84.049,125.875 84.049,120.218 87.464,116.803 v1(87.464,101.727)
DB14: J26.57 U6.32 | length 31.9
  Top Layer w0.152: J26.57@83.078,128.889 83.078,125.448 v1(83.531,124.995) ; v1(87.376,100.787) 87.408,100.755 87.408,98.846 U6.32@87.436,98.818
  Bottom Layer w0.152: v1(83.531,124.995) 83.531,119.77 86.868,116.434 86.868,101.295 v1(87.376,100.787)
DVDD10_PS: C38.2 C39.2 C155.2 C156.2 L5.2 R44.2 U100.28 U100.36 | length 13.5
  Top Layer w0.254: C155.2@158.941,114.656 158.941,114.556 159.164,114.333 159.589,114.333 162.37,111.551 v1(163.493,111.551) ; C156.2@159.551,106.426 159.557,106.42 162.969,106.42 163.974,107.424 v1(163.974,107.451) 163.979,107.451 164.752,108.224 164.801,108.224 164.828,108.251 U100.36@164.957,108.251 ; v1@163.562,111.551 163.662,111.451 U100.28@164.957,111.451
  other v1: 172.764,100.477 172.764,101.727 172.803,103.641
E6: "LED2 RED.2" J27.17 | length 18.7
  Top Layer w0.152: J27.17@117.078,128.889 117.078,126.971 127.96,116.09 127.96,114.706
E8: J27.58
E9: J27.25 R93.2 | length 89.4
  Top Layer w0.152: v1(109.474,209.296) R93.2@109.474,210.59 ; v1(115.062,130.658) 115.07,130.65 115.07,128.897 J27.25@115.078,128.889
  Bottom Layer w0.152: v1(109.474,209.296) 109.54,209.23 109.54,207.858 114.554,202.844 114.554,192.088 115.506,191.135 115.506,163.322 114.953,162.769 114.953,152.863 110.553,148.463 110.553,133.038 112.934,130.658 v1(115.062,130.658)
E12: J27.22
E13: J27.54
E14: J27.35 U100.23 | length 66.6
  Top Layer w0.152: J27.35@112.578,128.889 112.578,122.012 116.785,117.805 123.36,117.805 v1(123.376,117.788) ; v1(162.56,115.976) 163.017,115.519 164.389,115.519 166.065,113.843 U100.23@166.065,113.359
  Bottom Layer w0.152: v1(123.376,117.788) 123.41,117.822 123.576,117.822 123.609,117.856 132.004,117.856 132.08,117.856 ccw(c132.08,118.059) 132.283,118.059 cw(c132.486,118.059) 132.486,118.262 133.198,118.262 cw(c133.198,118.059) 133.401,118.059 cw(c133.198,118.059) 133.198,117.856 132.893,117.856 ccw(c132.893,117.653) 132.69,117.653 ccw(c132.893,117.653) 132.893,117.45 133.604,117.45 ccw(c133.604,117.653) 133.807,117.653 cw(c134.01,117.653) 134.01,117.856 134.087,117.856 160.68,117.856 v1(162.56,115.976)
E16: J27.40
E17: J26.48
E18: J26.38 | length 2.5
  Top Layer w0.152: J26.38@88.078,132.889 v1(88.078,135.433)
E19: J26.36 | length 4.1
  Top Layer w0.152: v1(88.125,136.783) 88.578,136.33 J26.36@88.578,132.889
F6: J16.3 J29.6 | length 81.1
  Top Layer w0.152: J29.6@120.078,160.889 120.078,158.511 120.078,158.112 120.078,157.323 v1@120.496,156.905
  Bottom Layer w0.152: v1(120.6,156.905) 120.6,156.884 122.595,154.889 166.167,154.889 172.72,161.442 J16.3@193.954,161.442
F9: J16.1 J29.4 | length 78.4
  Top Layer w0.152: J29.4@120.578,160.889 120.578,159.513 120.574,159.509 120.574,159.109 120.578,159.105 120.578,158.329 v1(120.596,158.311)
  Bottom Layer w0.152: v1(120.596,158.311) 167.76,158.311 173.584,164.135 193.802,164.135 J16.1@193.954,163.982
F12: J27.48
F14: J27.43 U100.27 | length 66.3
  Top Layer w0.152: J27.43@110.578,128.889 110.578,120.613 116.078,115.113 v1(122.784,115.113) ; v1(162.204,112.471) 163.397,112.471 164.017,111.851 U100.27@164.957,111.851
  Bottom Layer w0.152: v1(122.784,115.113) 122.829,115.158 159.518,115.158 v1(162.204,112.471)
F15: J27.53 R47.1 U100.17 | length 85.3
  Top Layer w0.152: J27.53@108.078,128.889 108.078,125.448 v1(108.531,124.995) ; R47.1@168.238,119.748 168.238,123.356 v1(168.25,123.368) ; R47.1@168.25,119.532 168.25,117.145 168.465,116.93 U100.17@168.465,113.359
  Bottom Layer w0.152: v1(108.531,124.995) 108.531,124.031 110.287,122.276 142.278,122.276 142.354,122.276 ccw(c142.354,122.479) 142.558,122.479 cw(c142.761,122.479) 142.761,122.682 147.047,122.682 cw(c147.047,122.479) 147.251,122.479 cw(c147.047,122.479) 147.047,122.276 143.167,122.276 ccw(c143.167,122.072) 142.964,122.072 ccw(c143.167,122.072) 143.167,121.869 147.454,121.869 ccw(c147.454,122.072) 147.657,122.072 cw(c147.86,122.072) 147.86,122.276 147.936,122.276 156.718,122.276 157.81,123.368 v1(168.25,123.368)
F16: J26.34 R98.2 | length 116.5
  Top Layer w0.152: v1(13.328,210.774) 13.328,212.495 R98.2@13.335,212.502 ; J26.34@89.078,132.889 v1(89.078,135.433)
  Bottom Layer w0.152: v1(13.328,210.774) 13.328,206.992 16.662,203.657 26.111,203.657 88.607,141.161 88.607,136.618 89.078,136.147 v1(89.078,135.433)
F17: J26.32 R104.2 | length 101.8
  Top Layer w0.152: v1(35.163,210.386) 35.163,212.106 R104.2@35.17,212.113 ; v1(89.125,136.783) 89.578,136.33 J26.32@89.578,132.889
  Bottom Layer w0.152: v1(35.163,210.386) 35.163,195.571 89.125,141.609 v1(89.125,136.783)
FIRSTDATA: J26.27 U6.15 | length 40.3
  Top Layer w0.152: v1(90.576,126.238) 90.578,126.24 90.578,126.984 90.576,126.986 90.576,127.568 90.578,127.57 J26.27@90.578,128.889 ; U6.15@96.786,96.468 99.846,96.468 v1(100.33,96.952)
  Bottom Layer w0.152: v1(90.576,126.238) 93.588,123.226 93.588,121.499 100.99,114.097 100.99,97.612 v1(100.33,96.952)
FPGA_DONE: "LED8 RED.2" J29.22 R112.1 | length 63.2
  Top Layer w0.152: v1(116.078,158.115) J29.22@116.078,160.889 ; v1(166.522,147.218) R112.1@168.408,147.218 170.29,147.218
  Bottom Layer w0.152: v1(116.078,158.115) 117.805,156.388 117.805,153.579 124.216,147.168 166.472,147.168 v1(166.522,147.218)
FPGA_TDI: J16.9 J29.8 | length 85.8
  Top Layer w0.152: v1@119.584,158.323 J29.8@119.584,160.883
  Bottom Layer w0.152: v1(119.596,158.311) 118.821,157.537 118.821,154.737 124.308,149.25 165.608,149.25 170.18,153.822 J16.9@193.954,153.822
FPGA_TMS: J16.5 J29.10 | length 84.7
  Top Layer w0.152: J29.10@119.072,160.895 119.072,157.329 v1@119.496,156.905
  Bottom Layer w0.152: v1(119.6,156.905) 119.6,155.279 123.241,151.638 165.456,151.638 172.72,158.902 J16.5@193.954,158.902
G14: J26.8
G15: J26.26 R111.2 | length 110.5
  Top Layer w0.152: v1(43.078,206.604) 46.781,210.306 v1(56.706,210.306) R111.2@56.706,212.026 R111.2@56.713,212.034 ; v1(90.624,136.783) 91.078,136.33 J26.26@91.078,132.889
  Bottom Layer w0.152: v1(43.078,206.604) 43.078,189.738 90.624,142.192 v1(90.624,136.783)
G19: J26.19 U6.11 | length 43
  Top Layer w0.152: J26.19@92.578,128.889 92.578,125.427 v1(93.077,124.928) ; U6.11@96.786,94.468 99.961,94.468 v1(100.432,94.94)
  Bottom Layer w0.152: v1(93.077,124.928) 102.464,115.541 102.464,96.445 100.959,94.94 v1(100.432,94.94)
G20: J26.17 U6.12 | length 42.6
  Top Layer w0.152: v1(93.078,126.345) J26.17@93.078,128.889 ; U6.12@96.786,94.968 v1(99.33,94.968)
  Bottom Layer w0.152: v1@93.046,126.378 v1(93.078,126.345) 92.549,125.816 92.549,124.773 102.159,115.164 102.159,96.571 101.054,95.466 100.275,95.466 99.812,95.003 99.365,95.003 v1(99.33,94.968)